# Altium PCB IOT_Speaker-PCB-v1.4.PcbDoc (part 3 of 3)
Units mil, origin at the board's own origin, x right, y up, seen from the top; angles counter-clockwise.
Board outline 2439.56 x 2668.89 mil, 2 copper layers (Top Layer, Bottom Layer), stack 61.811 mil thick; 113 components, 61 nets, 366 pads, 153 vias.
Unrouted connection lines stored in the file: 20.
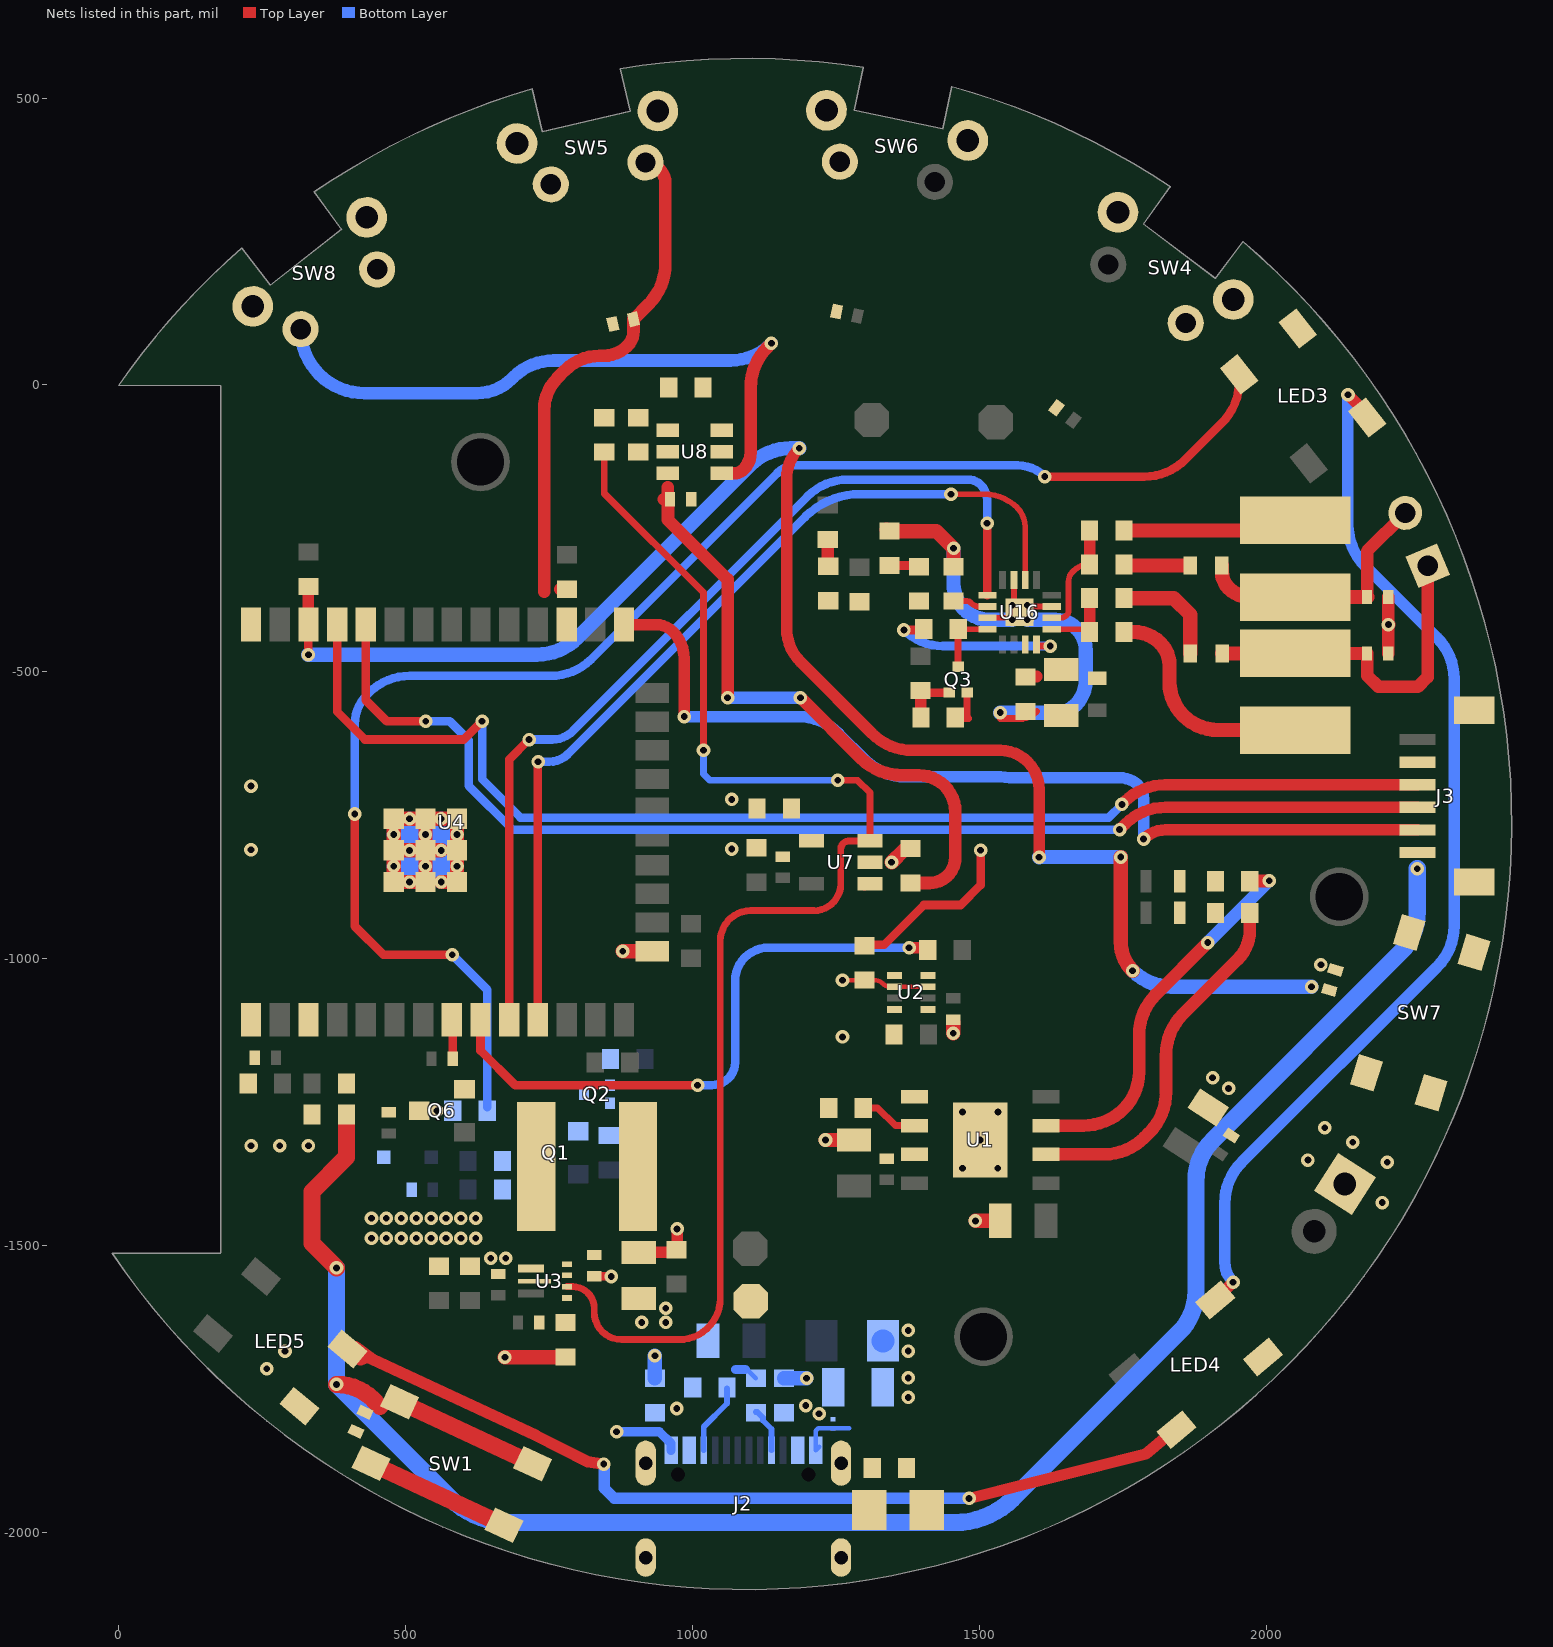
[diagram p2: the nets of this part, all layers, seen from the top]

## Via types
v1: diameter 23.62, hole 11.81, Top Layer to Bottom Layer, tented both sides, 135 vias
v2: diameter 23.62, hole 11.81, Top Layer to Bottom Layer, 18 vias

## Nets (pads, with @x,y where several pads share a name; then routed paths per layer and width w, separated by ;. In a path a pad name is that pad's centre, name@x,y a point inside that pad or via, vN(x,y) a via of type N, cw(c..) or ccw(c..) an arc to the next point about the centre after c; other vN are vias at no path point) (continued)
BUTTON_3: C24.1 R21.1 SW5.1 U4.27 | length 896.5
  Top Layer w22: 741.28,-360.05 741.28,-43.62 cw(c820.79,-43.62) 764.57,12.6 777.77,25.8 cw(c838.49,-34.92) 838.49,50.95 845.24,50.95 ccw(c845.24,108.99) 886.28,67.95 ccw(c860.52,93.71) 896.95,93.71 C24.1@896.95,114.48 923.2,140.73 ccw(c852.49,211.44) 952.49,211.44 952.49,352.05 ccw(c918.78,352.05) 918.78,385.76 SW5.1@923.2,381.34 ; R21.1@769.08,-356.05 R21.1@781.28,-356.05
  Top Layer w25: U4.27@780.34,-417.56 779.81,-417.03 U4.27@780.81,-416.03
BUTTON_4: C22.1 R22.1 SW7.1 SW7.2 U4.36 | length 2797.5
  Top Layer w15: v1(330.28,-470.05) U4.36@330.28,-417.62
  Top Layer w20: U4.36@330.31,-417.53 R22.1@330.28,-351.05 ; v1(1185.82,-110.21) ccw(c1238.61,-162.99) v1(1185.82,-110.21) ccw(c1238.61,-162.99) 1163.96,-162.99 1163.96,-424.03 ccw(c1247.42,-424.03) 1188.4,-483.05 1313.12,-607.76 ccw(c1383.83,-537.05) 1383.83,-637.05 1536.35,-637.05 cw(c1536.35,-704.7) 1604,-704.7 v1(1604,-823)
  Top Layer w25: U4.36@330.28,-417.62 U4.36@330.34,-417.56 ; v1(1746.28,-822.88) 1746.28,-970.97 ccw(c1817.03,-970.97) v1(1767,-1021)
  Bottom Layer w25: v1(330.28,-470.05) 728.53,-470.05 ccw(c728.53,-370.05) 799.24,-440.76 1100.5,-139.5 cw(c1171.21,-210.21) 1171.21,-110.21 v1(1185.82,-110.21) ; v1(1604,-823) 1604.12,-822.88 v1(1746.28,-822.88) ; v1@1767.03,-1021.03 ccw(c1834.08,-953.92) 1834.08,-1048.79 v1(2078.86,-1048.79)
CHRG: R4.2 U1.7 | length 673.2
  Top Layer w22: U1.7@1615.79,-1291.05 1680.86,-1291.05 ccw(c1680.86,-1191.05) 1751.57,-1261.76 ccw(c1687.08,-1197.27) 1778.28,-1197.27 1778.28,-1133.14 cw(c1878.28,-1133.14) 1807.57,-1062.43 v1(1898,-972) ; R4.2@1969.74,-864.59 v1@2005.08,-864.59
  Bottom Layer w22: v1(1898,-972) 1898,-971.68 2005.08,-864.6 v1(2005.08,-864.28)
DATA_IN: U4.10 U16.1 | length 1669.4
  Top Layer w15: U4.10@680.34,-1106.53 680.34,-652.66 v1(715,-618) ; v1(1513.28,-241.05) 1513.53,-241.29 1513.53,-366.26 U16.1@1513.77,-366.51
  Bottom Layer w15: v1(715,-618) 755.56,-618 ccw(c755.56,-567.86) 791,-603.33 ; 791.01,-603.31 1200.09,-194.24 cw(c1270.8,-264.95) 1270.8,-164.95 1480.31,-164.95 cw(c1480.31,-196.01) 1502.28,-174.05 cw(c1475.72,-200.6) 1513.28,-200.6 v1(1513.28,-241.05)
DETECTION: R6.2 U2.8 U4.9 | length 1055.9
  Top Layer w15: U4.9@630.34,-1106.54 630.34,-1160.06 690.76,-1220.49 v1(1008.74,-1220.49)
  Top Layer w20: v1(1377.28,-981.05) 1409.72,-981.05 R6.2@1410.03,-980.74
  Bottom Layer w15: v1(1008.74,-1220.49) 1032.85,-1220.49 ccw(c1032.85,-1177.85) 1063,-1208 ccw(c1036.44,-1181.44) 1074,-1181.44 1074,-1039.04 cw(c1132.04,-1039.04) 1091,-998 cw(c1132.68,-1039.68) 1132.68,-980.74 1376.97,-980.74 v1(1377.28,-981.05)
DIN: Q6.2 R26.2 U4.8 | length 80.1
  Top Layer w8: U4.8@580.34,-1106.53 U4.8@581.84,-1108.03
  Top Layer w15: U4.8@580.34,-1106.53 U4.8@580.34,-1094.72 ; R26.2@581.84,-1174.19 U4.8@581.84,-1108.03
DIN#: LED3.4 R28.2 | length 2668.3
  Top Layer w15: v1(411.28,-747.79) 411.28,-943.28 461,-993 v1(581.05,-993) ; v1(1613.83,-159.71) 1787.54,-159.71 ccw(c1787.54,-59.71) 1858.25,-130.42 1923.2,-65.47 ccw(c1852.49,5.24) 1952.49,5.24 LED3.4@1952.49,18.52
  Bottom Layer w15: v1(411.28,-747.79) 411.28,-590.75 cw(c482.98,-590.75) 432.28,-540.05 435.99,-536.34 cw(c506.7,-607.05) 506.7,-507.05 752.86,-507.05 ccw(c752.86,-407.05) 823.57,-477.76 1147.99,-153.34 cw(c1179.91,-185.26) 1179.91,-140.12 1566.52,-140.12 cw(c1566.52,-207.02) v1(1613.83,-159.71) ; v1(581.05,-993) 642.07,-1054.03 R28.2@642.07,-1258.96
DOUT1: LED3.2 LED4.4 | length 1880.4
  Top Layer w20: LED4.4@1909.13,-1593.23 cw(c1838.53,-1664.05) 1909.24,-1593.34 LED4.4@1910.92,-1595.02 v1@1941.05,-1564.89 ; v1(2142.37,-16.87) 2171.78,-46.28 cw(c2161.45,-56.61) LED3.2@2176.06,-56.61 LED3.2@2180.68,-61.23
  Bottom Layer w20: v1(1942.04,-1563.84) cw(c1976.72,-1529.17) 1927.68,-1529.17 1927.68,-1425.72 cw(c2027.68,-1425.72) 1956.97,-1355.01 2297.96,-1014.01 ccw(c2227.25,-943.3) 2327.25,-943.3 2327.25,-511.68 ccw(c2227.25,-511.68) 2297.96,-440.96 2171.66,-314.66 cw(c2242.37,-243.95) 2142.37,-243.95 v1(2142.37,-16.87)
DOUT2: LED4.2 LED5.4 | length 1608.7
  Top Layer w20: LED5.4@414.58,-1691.68 LED5.4@398.43,-1680.55 412.35,-1676.4 441.59,-1698.08 441.66,-1698.14 ; 421.05,-1699.53 434.3,-1694.71 441.66,-1698.14 ; 441.76,-1698.22 441.66,-1698.14 ; v1(845,-1881) 817.28,-1877.05 726.64,-1831.03 441.66,-1698.14 ; v1(1482,-1940.76) 1789.9,-1863.09 1827.16,-1831.82 LED4.2@1843.64,-1821.08
  Bottom Layer w20: v1(845,-1881) 845.69,-1881.69 845.69,-1922.69 863.76,-1940.76 v1(1482,-1940.76)
ENA: C14.2 C15.2 J3.6 R18.1 SW1.3 SW1.4 U4.3 | length 3519.8
  Top Layer w20: U4.3@330.34,-1106.53 U4.3@330.71,-1106.16
  Top Layer w30: v1(379.28,-1538.94) 336.5,-1496.16 336.5,-1406.16 396.5,-1346.16 C14.2@396.5,-1271.55 ; v1@379.33,-1742.05 cw(c379.28,-1832.54) 443.27,-1768.55 455.14,-1780.43 ; SW1.4@488.16,-1771.34 SW1.4@489.27,-1772.45 SW1.3@721.2,-1880.6
  Bottom Layer w30: v1(379.28,-1538.94) v1(379.28,-1742.05) 577.99,-1940.76 ccw(c679.97,-1838.78) 679.97,-1983 1456.58,-1983 ccw(c1456.58,-1838.77) 1558.57,-1940.76 1847.99,-1651.34 ccw(c1777.28,-1580.63) 1877.28,-1580.63 1877.28,-1387.14 cw(c1977.28,-1387.14) 1906.57,-1316.43 2233.99,-989.01 ccw(c2163.28,-918.3) 2263.28,-918.3 v1(2263.28,-843.05)
ENABLE: R10.2 U3.5 U7.3 | length 2393.9
  Top Layer w12: U3.5@781.28,-1571.73 791.06,-1571.73 cw(c791.06,-1609.18) 828.51,-1609.18 828.51,-1616.27 ccw(c876.28,-1616.27) 876.28,-1664.05 976.28,-1664.05 ccw(c976.28,-1592.05) 1048.28,-1592.05 1048.28,-969.13 cw(c1101.08,-969.13) 1101.08,-916.33 1211.48,-916.33 ccw(c1211.48,-869.54) 1243.11,-904.02 ccw(c1211.48,-869.54) 1252.98,-891.15 ccw(c1211.48,-869.54) 1258.27,-869.54 1258.27,-809.55 cw(c1273.17,-809.55) 1273.17,-794.65 U7.3@1309.46,-794.65 1309.46,-710.65 1287.81,-689 v1(1253,-689) ; R10.2@846,-117 846,-188.96 1019,-361.96 v1(1019,-636.85)
  Bottom Layer w12: v1(1019,-636.85) 1019,-678.05 1029.95,-689 v1(1253,-689)
GAIN: R36.1 R37.1 R38.1 R39.1 U16.2 | length 71.3
  Top Layer w10: R36.1@1454.88,-376.64 1478.48,-376.65 cw(c1478.48,-384.84) 1484.28,-379.05 1485.4,-380.17 ccw(c1499.95,-365.61) 1499.95,-386.2 U16.2@1513.77,-386.2
  Top Layer w15: R38.1@1230.88,-377.65 cw(c1233.29,-380.06) R38.1@1233.29,-376.65
  Top Layer w20: R38.1@1236.5,-376.02 ccw(c1240.43,-372.09) R38.1@1240.43,-377.65 ; R37.1@1290.88,-377.64 cw(c1293.29,-380.06) R37.1@1293.29,-376.65
GND: C1.1 C2.1 C3.1 C4.2 C5.1 C6.1 C7.1 C9.1 C10.1 C11.1 C12.2 C13.1 C14.1 C15.1 C16.1 C17.1 C18.1 C19.2 C20.1 C21.2 C22.2 C23.1 C24.2 C25.1 C26.1 C74.1 C75.1 C76.1 C77.1 C78.1 C79.1 C83.1 C102.1 C103.1 D1.2 D2.1 J1.1 J2.A1/B12 J2.B1/A12 J3.2 J3.MP1 J3.MP2 LED3.3 LED4.3 LED5.3 P3.1 Q2.2 Q3.2 R1.1 R2.1 R5.1 R8.1 R12.2 R36.2 R54.1 R66.2 R69.1 SW1.1 SW1.2 SW4.1 SW4.SH1 SW4.SH2 SW5.2 SW5.SH1 SW5.SH2 SW6.2 SW6.SH1 SW6.SH2 SW7.3 SW7.4 SW8.1 SW8.SH1 SW8.SH2 U1.1 U1.3 U1.9 U2.1 U2.4 U2.5 U3.1 U3.6 U4.1 U4.15 U4.38 U4.39 U4.39_16 U4.40 U4.41 U4.42 U4.43 U4.44 U4.45 U4.46 U4.47 U7.2 U8.2 U8.3 U16.3 U16.11 U16.15 U16.17 | length 3384.2
  Top Layer w10: U16.3@1513.77,-405.88 U16.17@1557.28,-405.88 ; U16.17@1560.03,-372.28 U16.15@1560.03,-339.94 ; U16.17@1593.64,-386.2 U16.11@1625.98,-386.2
  Top Layer w12: R12.2@1457.88,-581.65 1481.28,-581.65 cw(c1487.68,-575.24) 1478.62,-575.24 Q3.2@1478.62,-536.28 ; v1@1536.28,-581.65 1568.49,-581.65 ccw(c1568.49,-537.26) 1599.88,-568.65 ; U16.17@1555.28,-384.05 cw(c1555.28,-390.34) 1559.72,-385.88 U16.17@1569.88,-396.04
  Top Layer w15: C18.1@828.28,-1553.55 828.51,-1553.77 857.77,-1553.77 v1(858,-1554) ; C74.1@1301.03,-975.98 1333.71,-975.98 1403.31,-906.37 1467.32,-906.37 1502,-871.69 v1@1502,-811
  Top Layer w20: C74.1@1299.61,-977.4 C74.1@1301.03,-975.98
  Top Layer w22: C10.1@2212.68,-468.05 2212.68,-419.25 2213.86,-418.08 2213.86,-417.2 2212.68,-416.02 C11.1@2212.68,-369.65
  Top Layer w25: U4.39_16@561.84,-866.38 U4.45@589.4,-866.38 U4.39_16@589.4,-838.82 U4.47@589.4,-756.14 U4.39_16@561.84,-756.14 U4.44@534.28,-756.14 ; U4.39_16@561.84,-811.26 U4.43@534.28,-811.26 ; v1(672.78,-1694.72) R8.1@777.6,-1694.72 ; v1@878,-986.85 U4.15@929.55,-986.85 ; v1(1231.64,-1316.05) C5.1@1281.28,-1316.05 ; R66.2@1337.88,-252.15 1340.38,-254.65 1424.88,-254.65 v1(1454.88,-284.65) R36.2@1454.88,-316.64 ; v1(1346.92,-832.05) 1368.42,-810.55 1376.96,-810.55 C75.1@1379.46,-808.05 ; v1(1454.16,-1130) C7.1@1454.16,-1110.75 ; v1(1493,-1457.05) C6.1@1536.28,-1457.05 ; U4.40@479.16,-811.26 U4.43@534.28,-811.26 ; U4.40@479.16,-811.26 U4.41@479.16,-756.14 U4.44@534.28,-756.14 ; U4.40@479.16,-811.26 U4.39@479.16,-866.38 U4.39_16@506.72,-866.38 U4.42@534.28,-866.38 U4.43@534.28,-811.26 ; U4.43@534.28,-811.26 U4.44@534.28,-756.14
  Top Layer w30: SW1.1@439.36,-1879.49 SW1.2@671.29,-1987.64
  Bottom Layer w8: 1091.88,-1712.92 R1.1@1110.28,-1731.32 ; J2.A1/B12@1220.48,-1850.92 J2.A1/B12@1214.48,-1856.92 1214.48,-1822.94 1219.17,-1818.25 1273.37,-1818.25
  Bottom Layer w16: v1(867.51,-1824.49) 941.82,-1824.49 962.51,-1845.18 J2.B1/A12@962.51,-1856.92 ; 1075.32,-1715.92 1091.88,-1715.92
  Bottom Layer w25: U4.39_16@479.16,-838.82 506.72,-838.82 ; U4.39_16@479.16,-783.7 506.72,-783.7 ; U4.39_16@506.72,-866.38 506.72,-838.82 ; U4.39_16@506.72,-756.14 506.72,-783.7 ; U4.39_16@561.84,-866.38 561.84,-838.82 561.84,-783.7 ; U4.39_16@561.84,-756.14 561.84,-783.7 ; U4.39_16@589.4,-838.82 506.72,-838.82 ; U4.39_16@589.4,-783.7 561.84,-783.7 ; C4.2@934.28,-1731.32 v1(934.28,-1692.05) ; C12.2@1159.28,-1731.32 v1(1198.66,-1731.32) ; v1(1454.88,-284.65) 1454.88,-346.46 ccw(c1517.53,-346.46) 1514.73,-409.05 v1(1557.28,-409.05) ; v1(1536.28,-571.05) 1635.89,-571.05 ccw(c1635.89,-526.66) 1667.28,-558.05 ccw(c1623.82,-514.59) 1685.28,-514.59 1685.28,-461.89 ccw(c1632.55,-461.89) 1669.83,-424.6 ccw(c1632.28,-462.16) 1632.28,-409.05 v1(1583.28,-409.05) ; 506.72,-838.82 U4.39_16@506.72,-811.26 506.72,-783.7 ; 506.72,-783.7 561.84,-783.7
  other v1: 257.6,-1714.61 289.46,-1684.45 911.28,-1634 953,-1634 953,-1609.18 2202.28,-1425.05 1470.55,-1365.39 1531.99,-1365.39 2210.8,-1354.88 2072.56,-1351.15 230.34,-1326.05 280.34,-1326.05 330.34,-1326.05 2150.8,-1319.88 1501.28,-1316.05 2101.8,-1294.88 1470.28,-1267.05 1532.28,-1267.05 1934.28,-1226.16 1906.29,-1207.63 2095.19,-1010.75 878.06,-986.85 1502.05,-810.95 230.28,-810.05 1068.17,-808.81 1068.17,-722.31 230.28,-699.05 2212.86,-417.64 1557.28,-384.05 1583.28,-384.05
  other v2: 648.16,-1522.29 674.16,-1522.29 440.31,-1487.29 466.16,-1487.29 492.16,-1487.29 518.16,-1487.29 544.16,-1487.29 570.16,-1487.29 596.16,-1487.29 622.16,-1487.29 440.31,-1452.29 466.16,-1452.29 492.16,-1452.29 518.16,-1452.29 544.16,-1452.29 570.16,-1452.29 596.16,-1452.29 622.16,-1452.29
IO0: J3.5 U4.25 | length 1652.1
  Top Layer w20: U4.25@880.34,-417.56 935.83,-417.56 cw(c935.83,-460.01) 965.85,-429.99 cw(c918.93,-476.91) 985.28,-476.91 v1(985.28,-578.05) ; v1(1786.15,-791.39) cw(c1824.45,-829.68) 1786.3,-791.25 cw(c1824.45,-829.68) 1824.45,-775.53 J3.5@2263.28,-775.53
  Bottom Layer w20: v1(985.28,-578.05) 1183.68,-578.05 cw(c1183.68,-678.05) 1254.39,-607.34 1300.81,-653.76 ccw(c1371.52,-583.05) 1371.52,-683.05 1536.57,-683.05 cw(c1536.57,-783.05) 1552.44,-684.31 1743.34,-684.31 cw(c1743.34,-733.24) 1773.36,-694.61 cw(c1743.34,-733.24) 1777.93,-698.64 ; 1776.06,-696.87 cw(c1751.71,-721.23) 1786.15,-721.23 v1(1786.15,-791.39)
LRCLK: U4.11 U16.14 | length 1606.5
  Top Layer w10: v1(1450.37,-190.26) 1508.45,-190.26 cw(c1508.45,-271.56) 1565.94,-214.07 cw(c1532.67,-247.34) 1579.72,-247.34 U16.14@1579.72,-339.94
  Top Layer w15: U4.11@730.34,-1106.53 v1@730.34,-657.01
  Top Layer w20: v1@730.34,-657.01 v1(730.58,-656.77)
  Bottom Layer w15: v1(730.58,-656.77) 749.94,-656.77 ccw(c749.94,-610.03) 782.98,-643.09 1196.05,-230.02 ; 1196.05,-230.02 cw(c1292.04,-326) 1292.04,-190.26 v1(1450.37,-190.26)
NetC10_2: C10.2 FB2.2 J9.1 L2.2 | length 606.3
  Top Layer w22: L2.2@2050.68,-467.65 2051.08,-468.05 C10.2@2175.68,-468.05 2175.68,-506.45 2195.28,-526.05 2264.29,-526.05 2281.35,-508.98 J9.1@2281.35,-315.1
  Top Layer w25: FB2.2@1922.84,-468.05 2050.28,-468.05 L2.2@2050.68,-467.65
NetC11_2: C11.2 FB3.2 J9.2 L3.2 | length 462.2
  Top Layer w22: C11.2@2175.68,-369.65 2175.68,-289.65 J9.2@2242.28,-223.05
  Top Layer w25: FB3.2@1922.68,-314.65 1922.68,-325.63 ccw(c1963.01,-325.63) 1934.49,-354.14 ccw(c1971.91,-316.72) 1971.91,-369.65 L3.2@2050.68,-369.65 C11.2@2175.68,-369.65
NetC76_2: C76.2 U7.4
NetC102_2: C102.2 C103.2 FB1.2 R65.2 U16.7 U16.8 | length 323.6
  Top Layer w12: R65.2@1401.48,-427.05 R65.2@1402.88,-425.65 ; U16.8@1599.4,-452.14 ccw(c1606.42,-445.13) 1606.42,-455.05 v1(1623.28,-455.05)
  Top Layer w15: v1(1368.28,-427.05) R65.2@1401.48,-427.05
  Top Layer w20: 1599.4,-507.5 ccw(c1601.02,-507.5) 1599.88,-508.65
  Bottom Layer w15: v1(1368.28,-427.05) ccw(c1435.88,-359.45) 1435.88,-455.05 v1(1623.28,-455.05)
NetF1_2: F1.2 FB7.1 | length 0.3
  Bottom Layer w40: FB7.1@1331.59,-1666.05 FB7.1@1331.82,-1666.28
  other v1: 1376,-1764.8 1376,-1730.76 1376,-1684.04 1376,-1648
NetFB2_1: FB2.1 R31.2 | length 195.3
  Top Layer w25: R31.2@1751.88,-371.64 1838.84,-371.65 1867.72,-400.52 FB2.1@1867.72,-468.05
NetFB3_1: FB3.1 R34.2 | length 111.7
  Top Layer w25: R34.2@1751.88,-314.65 FB3.1@1863.62,-314.65
NetJ2_A5: J2.A5 R1.2 | length 79.7
  Bottom Layer w10: R1.2@1110.28,-1790.05 1112.78,-1790.05 1122.78,-1800.05 1122.78,-1805.05 1137.71,-1819.98 J2.A5@1137.71,-1856.92
NetJ2_B5: J2.B5 R2.2 | length 124.7
  Bottom Layer w10: J2.B5@1019.6,-1856.92 1019.6,-1815.72 1060.1,-1775.22 R2.2@1060.1,-1749.05
NetL1_2: L1.2 U3.2
NetL2_1: L2.1 R32.2 | length 407.5
  Top Layer w25: R32.2@1751.88,-430.64 1768.44,-430.65 cw(c1768.44,-496.89) 1815.28,-450.05 cw(c1776.64,-488.69) 1831.28,-488.69 1831.28,-518.19 ccw(c1913.1,-518.19) 1855.25,-576.05 ccw(c1916.7,-514.59) 1916.7,-601.5 L2.1@2050.68,-601.5
NetL3_1: L3.1 R35.2 | length 306.2
  Top Layer w25: R35.2@1751.88,-253.64 2032.82,-253.64 L3.1@2050.68,-235.79
NetLED1_2: LED1.2 R3.1
NetLED2_2: LED2.2 R4.1
NetQ1_1: Q1.1 Q2.3 R55.2
NetQ2_1: Q2.1 R56.2
NetQ3_1: Q3.1 R11.1 R12.1 | length 88.7
  Top Layer w15: R11.1@1405.66,-536.28 Q3.1@1447.13,-536.28
  Top Layer w20: R11.1@1396.89,-534.66 cw(c1394.46,-537.06) R11.1@1397.88,-537.06 ; R12.1@1397.88,-579.65 R11.1@1397.88,-535.06
NetQ6_3: Q6.3 R27.2 R28.1 | length 30.4
  Top Layer w8: Q6.3@523.49,-1265.04 v1(553.84,-1265.04)
NetR5_2: R5.2 U1.2 | length 102.3
  Top Layer w12: R5.2@1297.28,-1260.05 1322.35,-1260.05 1353.35,-1291.05 U1.2@1386.77,-1291.05
NetR7_1: R7.1 R8.2 U3.4
NetR10_1: R10.1 R29.2 R30.2
NetR29_1: R29.1 U8.4
NetR30_1: R30.1 U8.5
NetR38_2: R38.2 R67.1 | length 49.5
  Top Layer w15: R38.2@1229.88,-315.23 ccw(c1233.29,-315.23) R38.2@1230.88,-317.65
  Top Layer w22: R67.1@1235.5,-269.42 1235.5,-313.6 ccw(c1238.92,-313.6) R38.2@1236.5,-316.02
NetR39_2: R39.2 R66.1 | length 52.5
  Top Layer w15: R66.1@1342.88,-314.65 1390.05,-314.65 cw(c1390.05,-321.47) R39.2@1394.88,-316.64
NetSW8_2: SW8.2 U8.1 | length 1181.9
  Top Layer w22: U8.1@1051.12,-154.05 1072.14,-154.05 ccw(c1072.13,-130.22) 1088.98,-147.07 ccw(c1059.29,-117.38) 1101.28,-117.38 1101.28,-4.6 cw(c1201.28,-4.6) 1130.57,66.11 v1(1137.4,72.95)
  Bottom Layer w22: SW8.2@316.75,97.31 ccw(c428.39,97.31) 428.39,-14.33 623.85,-14.33 ccw(c623.85,72.15) 685,11 687.45,13.45 cw(c758.16,-57.26) 758.16,42.74 1065.78,42.74 ccw(c1065.78,142.74) 1136.49,72.03 v1(1137.4,72.95)
OUTN: R34.1 R35.1 U16.10 | length 197.8
  Top Layer w10: U16.10@1625.98,-405.88 1640.61,-405.88 ccw(c1640.61,-389.37) 1652.28,-401.05 ccw(c1645.04,-393.8) 1655.28,-393.8 1655.28,-342.84 ; 1655.28,-342.8 cw(c1679.48,-342.78) 1662.37,-325.67 1663.73,-324.3 cw(c1691.88,-352.45) 1681.88,-313.92 R34.1@1691.88,-312.64
  Top Layer w20: R34.1@1691.88,-312.64 R35.1@1691.88,-253.64
OUTP: R31.1 R32.1 U16.9 | length 130
  Top Layer w10: U16.9@1625.98,-425.57 1686.8,-425.57 R32.1@1691.88,-430.64
  Top Layer w20: R32.1@1691.88,-430.64 1691.88,-371.98 R31.1@1691.88,-368.65
RXD: J3.4 U4.34 | length 2116.6
  Top Layer w15: U4.34@430.34,-417.56 430.34,-549.34 467,-586 v1(535,-586)
  Top Layer w20: v1(1744.28,-775.05) 1753.88,-765.45 cw(c1824.59,-836.16) 1824.59,-736.16 J3.4@2263.28,-736.16
  Bottom Layer w15: v1(535,-586) 576.7,-586 610,-619.3 610,-698.79 686.26,-775.05 v1(1744.28,-775.05)
SD_MODE: Q3.3 R65.1 U16.4 | length 118.3
  Top Layer w10: R65.1@1462.96,-425.57 U16.4@1513.77,-425.57
  Top Layer w12: Q3.3@1462.88,-493.01 R65.1@1462.88,-425.65 R65.1@1462.96,-425.57
SHELL: C79.2 J2.S1 J2.S2 J2.S3 J2.S4 R69.2
STDBY: R3.2 U1.6 | length 635.8
  Top Layer w22.01: U1.6@1615.79,-1341.05 1716.86,-1341.05 ccw(c1716.86,-1241.05) 1787.57,-1311.76 1795.99,-1303.34 ccw(c1725.28,-1232.63) 1825.28,-1232.63 1825.28,-1167.47 cw(c1925.28,-1167.47) 1854.57,-1096.76 1950.62,-1000.7 ccw(c1900.75,-950.83) 1971.28,-950.83 R3.2@1971.28,-920.05
TXD: J3.3 U4.35 | length 2216.3
  Top Layer w15: U4.35@380.34,-417.56 380.34,-569.34 429,-618 601,-618 v1(633,-586)
  Top Layer w20: v1(1748.28,-731.05) 1753.25,-726.08 cw(c1823.96,-796.79) 1823.96,-696.79 J3.3@2263.28,-696.79
  Bottom Layer w15: v1(633,-586) 633,-687 700.05,-754.05 1725.28,-754.05 v1(1748.28,-731.05)
V_MON: Q1.3 R9.2
V_OR: C9.2 C16.2 C18.2 C74.2 C75.2 L1.1 R13.2 R14.1 U2.2 U2.7 U3.7 U7.1 U8.6 | length 1352.8
  Top Layer w8: v1@1267.28,-1037.4 C74.2@1299.61,-1037.4 1317.17,-1037.4 cw(c1317.17,-1057.12) 1331.11,-1043.17 ccw(c1345.37,-1028.92) 1345.37,-1049.08 U2.2@1352.14,-1049.08 U2.7@1410.41,-1049.08
  Top Layer w15: U7.1@1299.6,-873.76 1303.91,-869.45 U7.1@1309.46,-869.45
  Top Layer w20: C16.2@912.99,-1505.33 C16.2@906.28,-1512.05 956.07,-1512.05 ccw(c956.07,-1489.12) 972.28,-1505.33 973,-1504.61 v1(973,-1471)
  Top Layer w22: 949.75,-199 952.25,-199 957.2,-203.95 957.2,-235.06 1061,-338.87 v1(1061,-545) ; 956.63,-178.59 956.63,-199 C9.2@957.2,-199.56 ; v1(1188,-545) 1293.98,-650.98 ccw(c1364.69,-580.27) 1346.92,-678.68 ccw(c1364.69,-580.27) 1364.69,-680.27 1394.39,-680.27 cw(c1394.39,-743.76) 1457.88,-743.76 1457.88,-823.05 cw(c1412.88,-823.05) 1454.38,-840.45 cw(c1412.88,-823.05) 1430.28,-864.55 cw(c1412.88,-823.05) 1429.5,-864.87 cw(c1412.88,-823.05) 1412.88,-868.05 C75.2@1379.46,-868.05
  Bottom Layer w22: v1(1061,-545) v1(1188,-545)
  other v1: 1261.28,-1136.4 1261.28,-1037.4
VUSB: C4.1 C12.1 D1.1 F1.1 J2.A4/B9 J2.B4/A9
  other v1: 1220.48,-1793.05 972.28,-1784.05 1197.28,-1779.05
pads on no net: J2.A6 J2.A7 J2.A8 J2.B6 J2.B7 J2.B8 J2.MH LED5.2 U4.4 U4.5 U4.6 U4.14 U4.17 U4.18 U4.19 U4.20 U4.21 U4.22 U4.23 U4.24 U4.26 U4.29 U4.30 U4.31 U4.32 U4.37 U16.5 U16.6 U16.12 U16.13

## Polygon pours and split planes (outlines as drawn)
GND on Bottom Layer "NONET_L-01_P-001" (solid, pour order 0): 176.66,-1513.44 177.13,-1512.97 177.13,-1.08 0,-0.02 cw(c1093.32,-765.25) 213.91,238.52 264.02,174.38 388.12,271.35 340.46,336.62 cw(c1093.32,-765.25) 720.46,516.12 737.61,441.82 891.06,477.24 874,551.12 cw(c1093.32,-765.24) 1297.59,553.54 1281.77,479.1 1435.81,446.35 1451.52,520.29 cw(c1093.32,-765.24) 1832.73,345.7 1785.98,280.49 1911.1,185.86 1959.55,249.93 cw(c1093.32,-765.25) -11.73,-1513.44
GND on Top Layer "NONET_L-01_P-001" (solid, pour order 1): 176.66,-1513.44 177.13,-1512.97 177.13,-1.08 0,-0.02 cw(c1093.32,-765.25) 213.91,238.52 264.02,174.38 388.12,271.35 340.46,336.62 cw(c1093.32,-765.25) 720.46,516.12 737.61,441.82 891.06,477.24 874,551.12 cw(c1093.32,-765.24) 1297.59,553.54 1281.77,479.1 1435.81,446.35 1451.52,520.29 cw(c1093.32,-765.24) 1832.73,345.7 1785.98,280.49 1911.1,185.86 1959.55,249.93 cw(c1093.32,-765.25) -11.73,-1513.44

## Other copper
Top Layer:
  region net V_OR: 1366,-1120.3 1243.11,-1120.3 1243.11,-1151.85 1366,-1151.85
  region net 5V: 1512,-1151.85 1385.65,-1151.85 1385.65,-1197 1512,-1197
  region net 5V: 1432.7,-1185.46 1432.7,-1112.46 1386,-1112.46 1386,-1185.46
  rectangle net 5V_BOOST: 951.28,-1589 1032,-1544
  rectangle net GND: 875,-1631 939,-1572
  rectangle net V_OR: 871,-1533 996,-1441
  region net SHELL: 900.51,-1836 900.51,-1879.36 1276.49,-1879.36 1276.49,-1836
  region net SHELL: 900.51,-2029.2 900.51,-2072.2 1276.49,-2072.2 1276.49,-2029.2
  rectangle net SHELL: 897.45,-2071 940.45,-1836
  rectangle net SHELL: 1238,-2059.68 1343,-1836
  region net BUTTON_4: 2227.92,-1100.58 2233.28,-1083.05 2100.55,-1042.47 2095.19,-1060
  rectangle net GND: 208.28,-1347.05 251.28,-388.03
  region net BUTTON_3: 800,-447 800,-341 762,-341 762,-447
  rectangle net 5V_BOOST: 1683.8,-614 1725,-551.79
  rectangle net V_OR: 1243.11,-944.45 1317.11,-920
  rectangle net V_OR: 1287.46,-944.45 1317.11,-853.19
  rectangle net V_OR: 1243.11,-1052.4 1267.27,-927.05
  rectangle net V_OR: 936.95,-214.95 976.32,-142.24
  rectangle net 5V_BOOST: 457.98,-1317.18 482.98,-1291.68
  rectangle net NetQ6_3: 457.98,-1281.18 564.07,-1243.78
  rectangle net DIN: 572.84,-1243.78 631.44,-1206.69
  rectangle net DIN: 571.84,-1243.78 600.23,-1161.69
  region net GAIN: 1473.28,-360.5 1215.92,-360.5 1215.92,-396.05 1473.28,-396.05
  region net BATT: 1851.56,-1275.4 1738.45,-1410.21 1819.96,-1478.61 1933.08,-1343.8
  rectangle net 5V_BOOST: 1214.5,-232.05 1310.88,-196.05
  rectangle net 5V_BOOST: 1271.22,-334.05 1310.88,-197.92
  rectangle net 3.3V: 2166.68,-636.84 2294.77,-595.5
  rectangle net ENA: 2231.78,-866.08 2294.77,-805.05
  region net NetF1_2: 1401,-1781.04 1401,-1628.64 1345,-1628.64 1345,-1781.04
  region net 5V: 1808.57,-845.36 1768,-845.36 1768,-988 1808.57,-988
  region net BUTTON_4: 2121.87,-1077.92 2130.86,-1048.52 2066.99,-1028.99 2058,-1058.39
  rectangle net BUTTON_3: 730.34,-373.05 799.78,-341.05
  rectangle net 3.3V: 759.28,-320.05 830.34,-272
  rectangle net 3.3V: 307,-311.05 380.34,-264
  rectangle net GND: 1252.28,-1357.55 1410.39,-1316.05
  region net BATT: 1852.9,-1273.93 1817.26,-1328.8 2039.97,-1473.43 2075.61,-1418.56
  region net BATT: 1991.01,-1363.84 1912.56,-1484.66 2102.05,-1607.71 2180.5,-1486.9
  rectangle net GND: 1031.44,-128.46 1070.81,-67.43
  region net BUTTON_4: 2278.64,-934.6 2236.56,-921.73 2145.63,-1219.17 2187.71,-1232.03
  rectangle net NetR29_1: 988.28,-91.05 1008.78,13.45
  rectangle net NetR29_1: 988.28,-57.05 1033.28,13.45
  rectangle net NetR29_1: 936.95,-91.05 1008.78,-67.43
  rectangle net NetR10_1: 828,-57.05 973.28,-42.05
  rectangle net NetR10_1: 943.28,-57.05 973.28,13.45
  rectangle net NetR10_1: 825,-72.05 922.78,-42.05
  rectangle net NetR30_1: 887.78,-132.05 976.32,-102.05
  region net DOUT2: 360.15,-1674.13 427.4,-1730.55 460.48,-1691.13 393.23,-1634.71
  rectangle net GND: 875,-1649.05 971,-1596.05
  rectangle net V_OR: 871.4,-1532.05 938.33,-1249.84
  rectangle net NetL1_2: 694.23,-1516.06 761.43,-1249.84
  rectangle net NetL1_2: 749.78,-1565.83 761.16,-1249.84
  rectangle net GND: 210.28,-1347.05 351.5,-1254.05
  region net GND: 278.48,-1777.57 414.75,-1891.91 441.23,-1860.36 304.95,-1746.02
  rectangle net V_OR: 772.42,-1537.28 804.09,-1507.55
  rectangle net V_OR: 772.42,-1525.55 936.28,-1507.55
  rectangle net GND: 815.78,-1562.55 840.78,-1544.55
  rectangle net GND: 423.28,-1558.55 686.78,-1441.15
  rectangle net GND: 1048.28,-832.05 1127.28,-704.81
  rectangle net GND: 1094.18,-831.05 1169.78,-791.65
  rectangle net GND: 772.42,-1556.97 840.78,-1547.13
  rectangle net BATT: 1071,-1553.05 1130.72,-1062.86
  rectangle net GND: 523.78,-1547.13 740.92,-1533.35
  region net GND: 375.86,-1873.78 455.18,-1910.77 485.35,-1846.08 406.02,-1809.09
  region net ENA: 412.87,-1794.42 492.19,-1831.41 523.4,-1764.47 444.08,-1727.48
  rectangle net 5V_BOOST: 501.78,-1596.05 740.92,-1576.65
  rectangle net 5V_BOOST: 501.78,-1646.79 704.78,-1576.65
  rectangle net NetL1_2: 695.65,-1565.83 761.43,-1557.95
  rectangle net 5V: 1441.66,-1078.16 1639.41,-1041.05
  rectangle net DETECTION: 1395.03,-1035.3 1423.6,-963.24
  rectangle net NetC76_2: 1157.28,-755.55 1228.75,-720.55
  rectangle net NetC76_2: 1185.28,-806.46 1228.75,-720.55
  rectangle net V_OR: 1287.81,-883.05 1396.96,-853.05
  rectangle net 3.3V: 262.62,-1235.05 351.5,-1200.05
  rectangle net 3.3V: 262.62,-1235.05 300.28,-959.05
  rectangle net ENA: 312.62,-1181.42 411.5,-1147.61
  rectangle net ENA: 312.62,-1172.55 348.06,-1077.01
  rectangle net ENA: 381.5,-1289.05 411.5,-1147.61
  rectangle net NetR7_1: 723.78,-1651.79 795.78,-1616.79
  rectangle net NetR7_1: 763.78,-1651.79 790.27,-1586.5
  rectangle net 3.3V: 1048.28,-886.85 1228.75,-848.87
  rectangle net BATT: 1071,-1112 1322.15,-1062.86
  rectangle net BATT: 1291,-1074.67 1365.33,-1062.86
  rectangle net V_OR: 1255.28,-1052.4 1294.43,-1022.4
  rectangle net 5V: 1397.22,-1074.67 1466.66,-1062.86
  rectangle net 5V: 1171.28,-1480.02 1410.39,-1376.05
  rectangle net VUSB: 918.28,-1820.05 1214.48,-1768.8
  rectangle net BATT: 1592.16,-1553.05 1644.28,-1379.24
  rectangle net BATT: 1078.08,-1553.05 1644.28,-1499.05
  rectangle net 5V: 1501.28,-1216.05 1639.41,-1041.05
  rectangle net 5V: 1592.16,-1252.86 1639.41,-1041.24
  rectangle net BATT: 1592.16,-1519 2013.82,-1379.24
  rectangle net GND: 1467.28,-561.05 1495.28,-525.05
  rectangle net NetLED1_2: 1838.37,-939.73 1927.08,-898.82
  rectangle net NetLED2_2: 1838.37,-886.28 1927.08,-845.36
  region net GND: 1522.62,-601.76 1522.62,-551.76 1442.28,-551.76 1442.28,-601.76
  region net GND: 1673.28,-602.05 1673.28,-552.05 1466.28,-552.05 1466.28,-602.05
  region net NetC102_2: 1721.03,-525.05 1721.03,-476.05 1561.28,-476.05 1561.28,-525.05
  rectangle net NetC102_2: 1573.28,-525.05 1639.28,-438.05
Bottom Layer:
  region net V_OR: 1282.4,-1153.23 1282.4,-1020.06 1240.14,-1020.06 1240.14,-1153.23
  rectangle net V_OR: 1147.02,-1153.12 1280.19,-1110.86
  region net V_OR: 1147.02,-1112 1147.02,-1362.25 1189.28,-1362.25 1189.28,-1112
  region net V_OR: 1189.28,-1319.99 951.93,-1319.99 951.93,-1362.25 1189.28,-1362.25
  region net V_OR: 994.12,-1513.06 994.12,-1323.11 951.86,-1323.11 951.86,-1513.06
  rectangle net GND: 1082.78,-1746.32 1176.78,-1708.92
  region net NetQ2_1: 870.6,-1157.03 840.6,-1157.03 840.6,-1230.67 870.6,-1230.67
  region net 5V: 1521.47,-950.83 1521.47,-996.35 1807.3,-996.35 1807.3,-950.83
  region net 5V: 1625.33,-959.68 1521.27,-959.68 1521.27,-1165.05 1625.33,-1165.05
  rectangle net NetQ6_3: 530.86,-1282.54 597.07,-1238.03
  region net 3.3V: 2197.79,-644 2197.79,-592 1823.28,-592 1823.28,-644
  rectangle net 5V_BOOST: 1261.05,-1606 1390,-1510.79
  rectangle net 5V_BOOST: 1261.05,-1553.05 1724.39,-1510.79
  region net GND: 2101.26,-1254.32 2027.09,-1368.52 2189.64,-1474.08 2263.81,-1359.88
  region net BATT: 2017.65,-1381.14 1949.25,-1486.47 2112.1,-1592.23 2180.5,-1486.9
  rectangle net VUSB: 1155.49,-1819.98 1197.28,-1772.43
  rectangle net VUSB: 1141.78,-1807.05 1264.66,-1774.05
  rectangle net NetJ2_A5: 1092.78,-1812.51 1130.24,-1775.05
  rectangle net VUSB: 1141.78,-1807.05 1252.3,-1765.3
  rectangle net BATT: 884.33,-1295.05 1120,-1261.83
  rectangle net BATT: 884.33,-1391.8 917.28,-1262.05
  rectangle net BATT: 782.47,-1391.58 917.28,-1353.11
  rectangle net NetQ1_1: 782.47,-1323.11 819.28,-1226.05
  rectangle net NetQ1_1: 782.47,-1323.11 871.3,-1284.49
  rectangle net BAT_ADC: 532.8,-1415.94 625.78,-1331.78
  rectangle net 5V: 1084.28,-1503.19 1387.28,-1393.81
  rectangle net 5V: 1084.28,-1698.05 1252.29,-1402.44
  rectangle net 5V: 1521.27,-1217.05 1625.14,-1110.75
  rectangle net V_MON: 653.68,-1375.44 739.95,-1316.78
  rectangle net 5V: 1309.28,-1217.05 1608.28,-1149
  rectangle net 5V: 1309.28,-1503.19 1411.28,-1157.05
  rectangle net NetF1_2: 1304.26,-1780.51 1396.26,-1630.22
  rectangle net 5V: 1083.28,-1666.87 1252.29,-1517.05
  rectangle net VUSB: 1225.29,-1805.77 1264.66,-1713.58
  rectangle net VUSB: 909.28,-1810.05 1005.82,-1773.05
  rectangle net VUSB: 982.2,-1880.54 1005.82,-1798.05
  rectangle net VUSB: 1171.18,-1880.54 1194.8,-1775.05
  rectangle net GND: 1545.28,-421.05 1598.28,-368.05

## Silkscreen, mask and mechanical layers (free items; w line width, h text height)
Top Overlay:
  lines w5: 194.06,-1258.73 194.06,-1188.55 206.28,-1171 222.27,-1170.9 ; 304.28,-1317.18 304.28,-1238.55 ; 1787.66,-433.5 1798.73,-433.5 1815.28,-450.05 1815.28,-585.3 ; 1807.98,-578 1815.28,-585.3 ; 1822.58,-578 1815.28,-585.3 ; 1666.65,-458.98 1776.64,-458.98 1776.64,-226 1666.65,-226 1666.65,-458.98 ; 1731.5,-832 1870.57,-832 1870.57,-596.76 1731.5,-596.76 1731.5,-832
  lines w10: 414.5,-1217.55 423.55,-1217.55 433,-1227 433,-1384 423.55,-1393.45 ; 576.18,-1650.75 602.18,-1650.94 602.18,-1620.38 ; 652.87,-1617.22 660.05,-1602.86 ; 685.27,-1504.15 701.01,-1519.89 ; 1156.93,-890.61 1157.1,-876.72 ; 1946.69,-1287.71 1959.41,-1267.37
  text "VOL-" at 1176.36,385.79 h60 r78
  text "MUTE" at 1052.78,385.16 h60 r103
  text "VOL+" at 1614.94,248.87 h60 r52.9
  text "ON/OFF" at 302.09,-14.97 h60 r128
  text "5V_Boost" at 1184.98,-21.05 h60
  text "3V3" at 1466.33,-155.05 h60
  text "PROGRAM." at 2223.54,-856.07 h60 r90
  text "CHARGING" at 1474.74,-890.45 h60
  text "STANDBY" at 1474.74,-944.45 h60
  text "BUTTON4" at 2136.79,-1205.29 h60 r73
  text "-VE" at 2216.03,-1286.84 h40 r147
  text "BATTERY" at 1893.8,-1516.62 h65 r57
  text "BATT" at 1144.71,-1531.29 h60
  text "+VE" at 2052.78,-1574.48 h40 r147
  text "GND" at 1145,-1622 h60
  text "RESET" at 536.91,-1755.84 h55 r335
Bottom Overlay:
  drawing of 3090 lines, arcs and shapes, not listed
  text "ZERO CARBON FOOTPRINT" at 1509.4,-625.05 h38
  text "USB" at 915,-1983.92 h60
Dimension:
  circle w5: c-204,4264 r2.5
  lines w10: -204,4568.55 -204,4264 -51.73,4264
Board Outline:
  circle w10: c1507,-1659 r41.34
  circle w10: c2127,-892 r41.34
  circle w10: c630.28,-134.19 r41.34
  lines w0.5: 177.13,-1.06 0,0 177.87,0 ; 359.14,536.3 359.63,536.68
  lines w5: 176.66,-1513.44 177.13,-1512.97
  lines w10: 176.66,-1513.44 -11.73,-1513.44 ccw(c1093.32,-765.25) 1959.55,249.93 1911.1,185.86 1785.98,280.49 1832.73,345.7 ccw(c1093.32,-765.25) 1451.52,520.29 1435.81,446.35 1281.77,479.1 1297.59,553.54 ccw(c1093.32,-765.25) 874,551.12 891.06,477.24 737.61,441.82 720.46,516.12 ccw(c1093.32,-765.25) 340.46,336.62 388.12,271.35 264.02,174.38 213.91,238.52 ccw(c1093.32,-765.25) 0,-0.02 177.13,-1.08 177.13,-1512.97
Fabrication:
  drawing of 191 lines, arcs and shapes, not listed
  text "Layer" at 2895.34,-963 h60
  text "Name" at 3305.26,-963 h60
  text "Material" at 4235,-963 h60
  text "Thickness" at 5094.77,-963 h60
  text "Constant" at 5744.6,-963 h60
  text "Board Layer Stack" at 6314.46,-963 h60
  text "Top Overlay" at 3305.26,-1083 h60
  text "Top Solder" at 3305.26,-1203 h60
  text "Solder Resist" at 4235,-1203 h60
  text "0.39mil" at 5094.77,-1203 h60
  text "3.5" at 5744.6,-1203 h60
  text "1" at 2895.34,-1323 h60
  text "Top Layer" at 3305.26,-1323 h60
  text "1.38mil" at 5094.77,-1323 h60
  text "Dielectric 1" at 3305.26,-1443 h60
  text "FR-4" at 4235,-1443 h60
  text "59.06mil" at 5094.77,-1443 h60
  text "4.8" at 5744.6,-1443 h60
  text "2" at 2895.34,-1563 h60
  text "Bottom Layer" at 3305.26,-1563 h60
  text "1.38mil" at 5094.77,-1563 h60
  text "Bottom Solder" at 3305.26,-1683 h60
  text "Solder Resist" at 4235,-1683 h60
  text "0.39mil" at 5094.77,-1683 h60
  text "3.5" at 5744.6,-1683 h60
  text "Bottom Overlay" at 3305.26,-1803 h60
  text "Total board thickness:" at 2895.34,-1923 h60
  text "62.60mil" at 5094.77,-1923 h60
Drill Drawing:
  circle w10: c2918.05,280.33 r20
  circle w10: c2918.05,280.33 r33.33
  lines w10: 2884.71,-203.01 2951.38,-203.01 2951.38,-136.34 2884.71,-136.34 2884.71,-203.01 ; 2884.71,13.66 2951.38,13.66 2918.05,-53.01 2884.71,13.66 ; 2884.71,130.33 2918.05,96.99 2951.38,130.33 2918.05,163.66 2884.71,130.33 ; 2884.71,463.66 2951.38,463.66 2918.05,396.99 2884.71,463.66 ; 2884.71,563.66 2901.38,563.66 2918.05,546.99 2934.71,563.66 2951.38,563.66 2934.71,580.33 2951.38,596.99 2934.71,596.99 2918.05,613.66 2901.38,596.99 2884.71,596.99 2901.38,580.33 2884.71,563.66 ; 2884.71,696.99 2918.05,713.66 2951.38,696.99 2934.71,730.33 2951.38,763.66 2918.05,746.99 2884.71,763.66 2901.38,730.33 2884.71,696.99 ; 2898.05,450.33 2938.05,450.33 2918.05,410.33 2898.05,450.33 ; 2898.05,570.33 2908.05,570.33 2918.05,560.33 2928.05,570.33 2938.05,570.33 2928.05,580.33 2938.05,590.33 2928.05,590.33 2918.05,600.33 2908.05,590.33 2898.05,590.33 2908.05,580.33 2898.05,570.33
  lines w15: 2824.92,-248.01 12772.15,-248.01 ; 2824.92,801.99 12772.15,801.99 ; 3375.8,-398.01 3375.8,951.99 ; 3965.64,-398.01 3965.64,951.99 ; 5065.32,-398.01 5065.32,951.99 ; 5571.2,-398.01 5571.2,951.99 ; 6305,-398.01 6305,951.99 ; 7804.55,-398.01 7804.55,951.99 ; 8394.4,-398.01 8394.4,951.99 ; 9140.2,-398.01 9140.2,951.99 ; 10279.86,-398.01 10279.86,951.99 ; 11369.55,-398.01 11369.55,951.99 ; 2824.92,-398.01 12772.15,-398.01 12772.15,951.99 2824.92,951.99 2824.92,-398.01
  text "Symbol" at 2914.92,846.99 h72
  text "Count" at 3420.8,846.99 h72
  text "Hole Size" at 4010.64,846.99 h72
  text "Plated" at 5110.32,846.99 h72
  text "Hole Type" at 5616.2,846.99 h72
  text "Drill Layer Pair" at 6350,846.99 h72
  text "Via/Pad" at 7849.55,846.99 h72
  text "Pad Shape" at 8439.4,846.99 h72
  text "Template" at 9185.2,846.99 h72
  text "Hole Length" at 10324.86,846.99 h72
  text "Routed Path Length" at 11414.55,846.99 h72
  text "165" at 3420.8,696.99 h60
  text "11.81mil (0.300mm)" at 4010.64,696.99 h60
  text "PTH" at 5110.32,696.99 h60
  text "Round" at 5616.2,696.99 h60
  text "Top Layer - Bottom Layer" at 6350,696.99 h60
  text "(Mixed)" at 7849.55,696.99 h60
  text "Rounded" at 8439.4,696.99 h60
  text "(Mixed)" at 9185.2,696.99 h60
  text "-" at 10324.86,696.99 h60
  text "-" at 11414.55,696.99 h60
  text "2" at 3420.8,546.99 h60
  text "23.62mil (0.600mm)" at 4010.64,546.99 h60
  text "PTH" at 5110.32,546.99 h60
  text "Slot" at 5616.2,546.99 h60
  text "Top Layer - Bottom Layer" at 6350,546.99 h60
  text "Pad" at 7849.55,546.99 h60
  text "Rounded" at 8439.4,546.99 h60
  text "r90_170h60_140r100" at 9185.2,546.99 h60
  text "55.12mil (1.400mm)" at 10324.86,546.99 h60
  text "31.50mil (0.800mm)" at 11414.55,546.99 h60
  text "2" at 3420.8,396.99 h60
  text "23.62mil (0.600mm)" at 4010.64,396.99 h60
  text "PTH" at 5110.32,396.99 h60
  text "Slot" at 5616.2,396.99 h60
  text "Top Layer - Bottom Layer" at 6350,396.99 h60
  text "Pad" at 7849.55,396.99 h60
  text "Rounded" at 8439.4,396.99 h60
  text "(Mixed)" at 9185.2,396.99 h60
  text "66.93mil (1.700mm)" at 10324.86,396.99 h60
  text "43.31mil (1.100mm)" at 11414.55,396.99 h60
  text "2" at 3420.8,246.99 h60
  text "24.41mil (0.620mm)" at 4010.64,246.99 h60
  text "NPTH" at 5110.32,246.99 h60
  text "Round" at 5616.2,246.99 h60
  text "Top Layer - Bottom Layer" at 6350,246.99 h60
  text "Pad" at 7849.55,246.99 h60
  text "Rounded" at 8439.4,246.99 h60
  text "c0hn62" at 9185.2,246.99 h60
  text "-" at 10324.86,246.99 h60
  text "-" at 11414.55,246.99 h60
  text "10" at 3420.8,96.99 h60
  text "35.43mil (0.900mm)" at 4010.64,96.99 h60
  text "PTH" at 5110.32,96.99 h60
  text "Round" at 5616.2,96.99 h60
  text "Top Layer - Bottom Layer" at 6350,96.99 h60
  text "Pad" at 7849.55,96.99 h60
  text "(Mixed)" at 8439.4,96.99 h60
  text "(Mixed)" at 9185.2,96.99 h60
  text "-" at 10324.86,96.99 h60
  text "-" at 11414.55,96.99 h60
  text "10" at 3420.8,-53.01 h60
  text "39.37mil (1.000mm)" at 4010.64,-53.01 h60
  text "PTH" at 5110.32,-53.01 h60
  text "Round" at 5616.2,-53.01 h60
  text "Top Layer - Bottom Layer" at 6350,-53.01 h60
  text "Pad" at 7849.55,-53.01 h60
  text "(Mixed)" at 8439.4,-53.01 h60
  text "(Mixed)" at 9185.2,-53.01 h60
  text "-" at 10324.86,-53.01 h60
  text "-" at 11414.55,-53.01 h60
  text "3" at 3420.8,-203.01 h60
  text "82.68mil (2.100mm)" at 4010.64,-203.01 h60
  text "NPTH" at 5110.32,-203.01 h60
  text "Round" at 5616.2,-203.01 h60
  text "Top Layer - Bottom Layer" at 6350,-203.01 h60
  text "Pad" at 7849.55,-203.01 h60
  text "Rounded" at 8439.4,-203.01 h60
  text "c260hn210m265" at 9185.2,-203.01 h60
  text "-" at 10324.86,-203.01 h60
  text "-" at 11414.55,-203.01 h60
  text "194 Total" at 3420.8,-353.01 h60
  text "Slot definitions :" at 2914.92,-497.98 h60
  text "Routed Path Length" at 3947.61,-497.98 h60
  text "= Calculated from tool start centre position to tool end centre position." at 5050.28,-497.98 h60
  text "Hole Length" at 3947.61,-597.95 h60
  text "= Routed Path Length + Tool Size = Slot length as defined in the PCB layout" at 4640.41,-597.95 h60

## Text inside footprints (layer, text, board x,y; h text height)
J2: Bottom Overlay "Board Edge" at 1223.48,-2039.59 h28